# Altium PCB PCB_TEAM07_SMT_PCB.PcbDoc
Units mil, origin at the board's own origin, x right, y up, seen from the top; angles counter-clockwise.
Board outline 4932.76 x 3238.5 mil, 2 copper layers (Top Layer, Bottom Layer); 102 components, 54 nets, 304 pads, 154 vias.
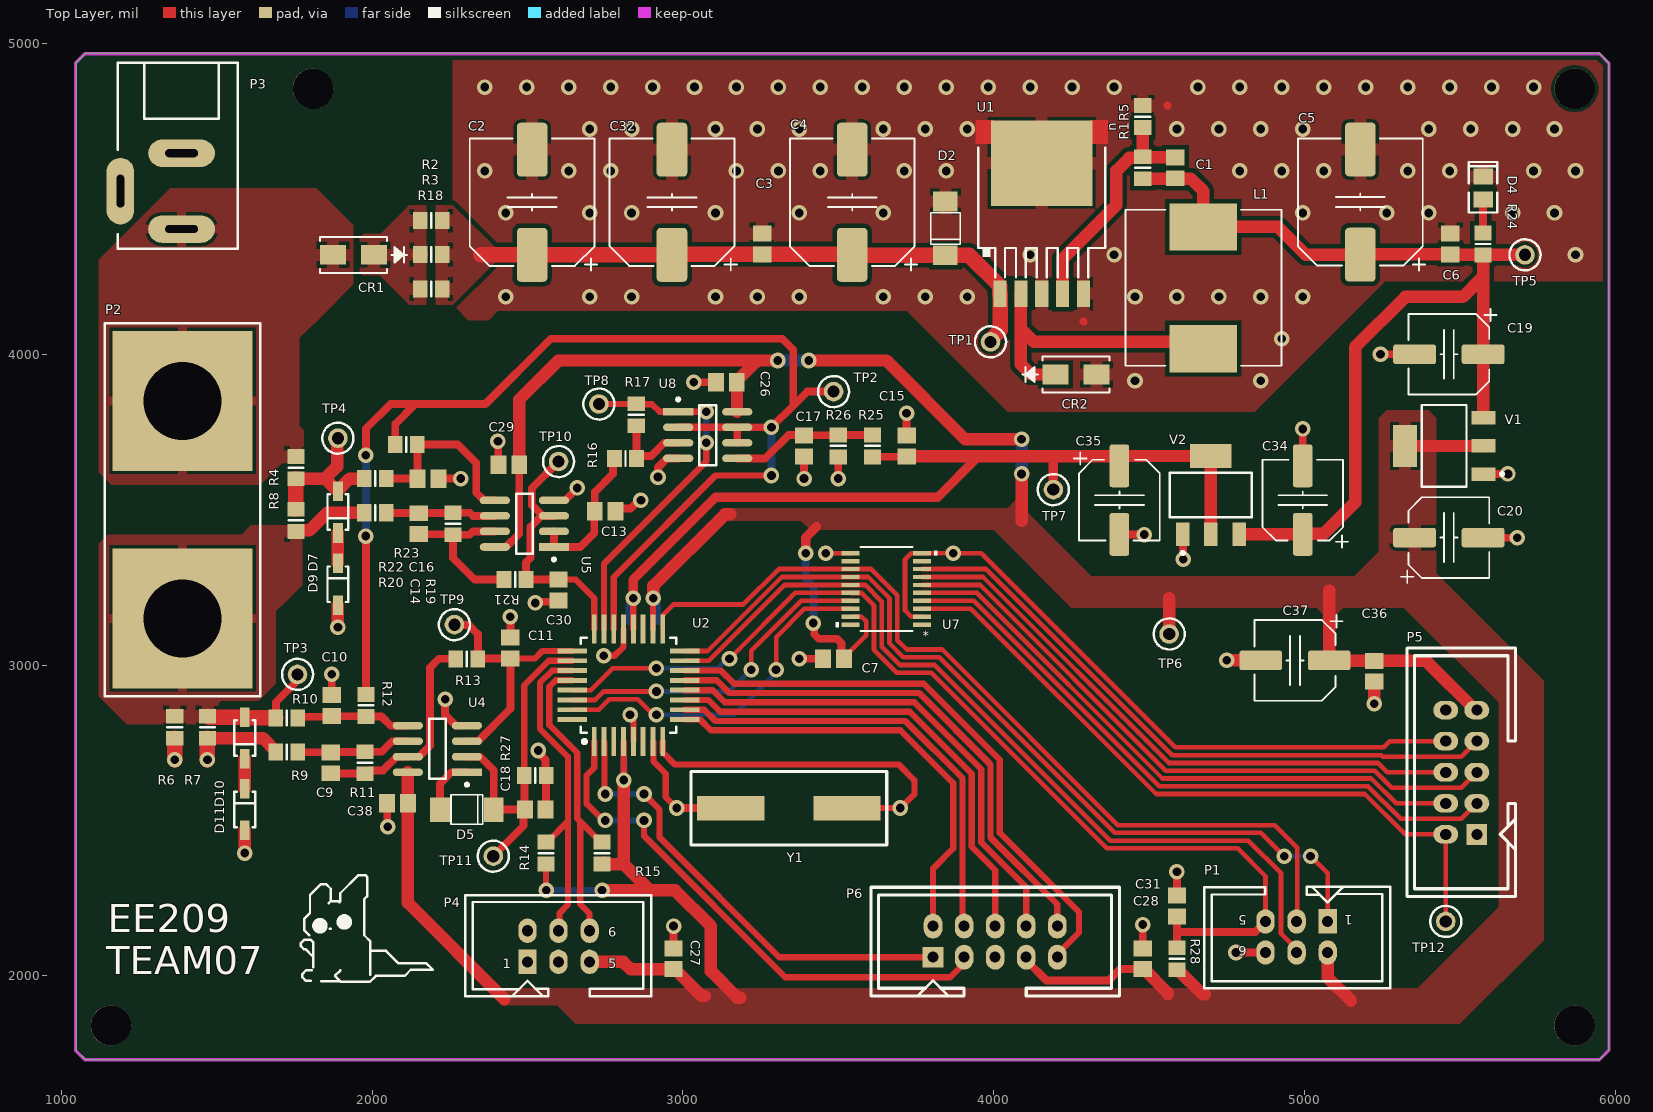
[diagram p0: Top Layer view]
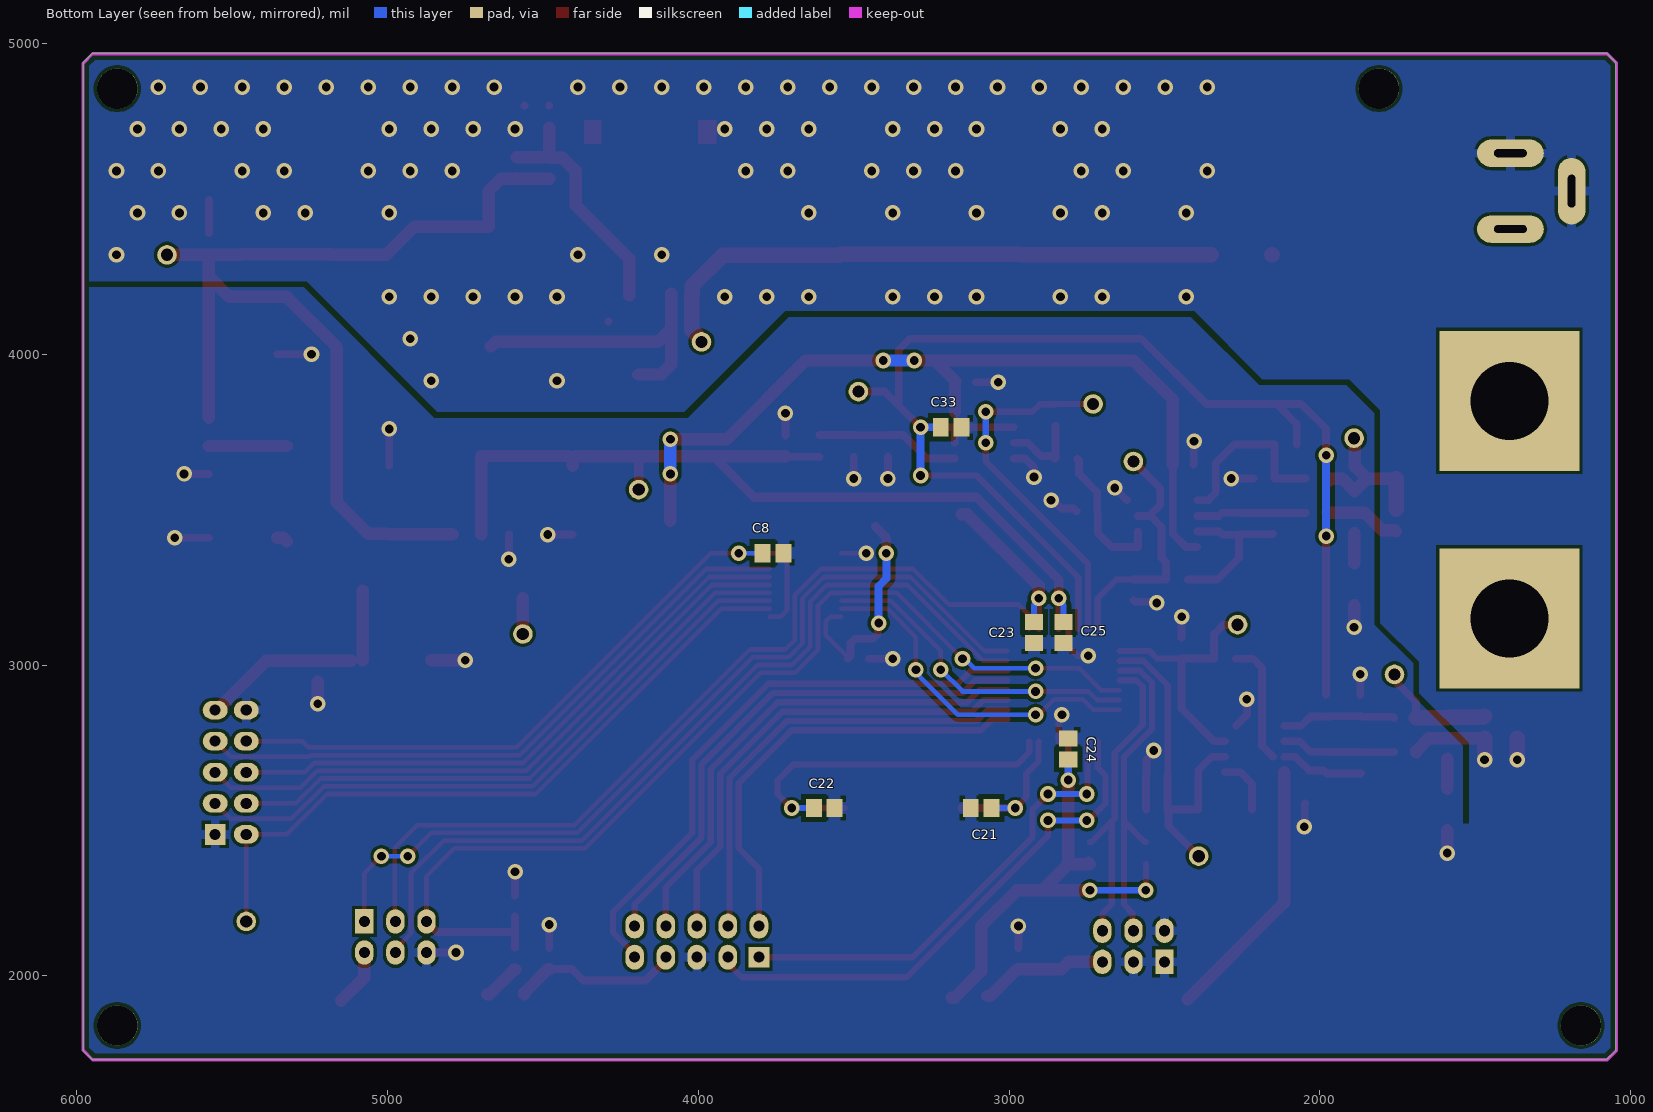
[diagram p1: Bottom Layer view, seen from below]
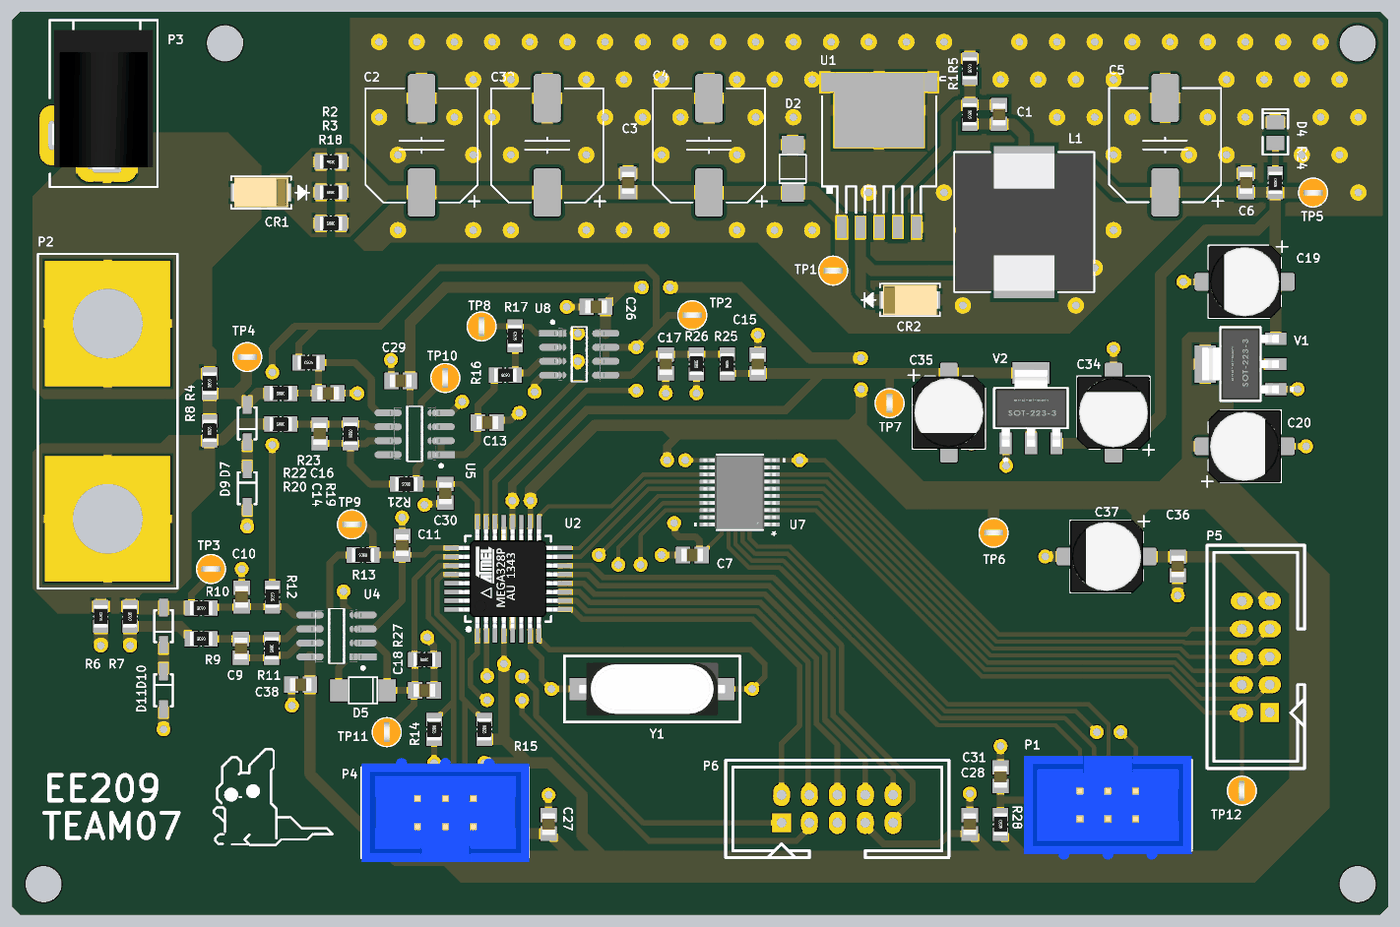
[diagram p2: 3D render of the assembled board from above, using the file's embedded part models]
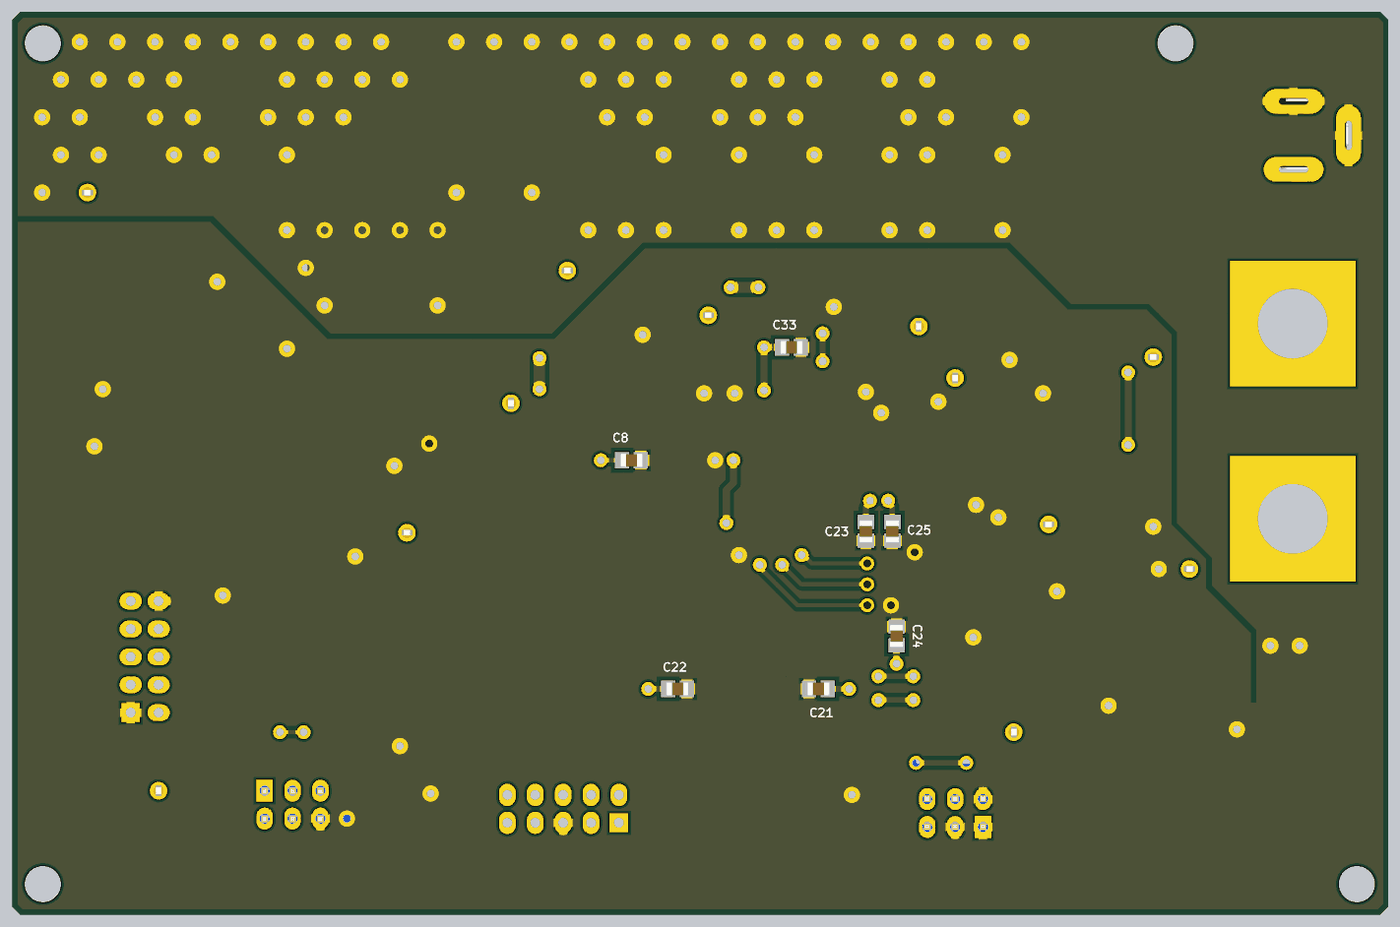
[diagram p3: 3D render of the assembled board from below, using the file's embedded part models]

## Layer stack, top to bottom
Top Solder: solder mask 0.4, Solder Resist, Dk 3.5
Top Layer: signal copper 1.4
Dielectric 1: dielectric 12.6, FR-4, Dk 4.8
Bottom Layer: signal copper 1.4
Bottom Solder: solder mask 0.4, Solder Resist, Dk 3.5

## Board outline
1047.24,1760 1047.24,4938.5 1077.24,4968.5 5950,4968.5 5980,4938.5 5980,1760 5950,1730 1077.24,1730

## Design rules (kind name [scope] priority, off if disabled: settings)
BoardOutlineClearance [All] p1: gap=11.81 ignorepadtopadclearanceinfootprint=FALSE except(15.75: Arc-SplitBarrior Arc-SplitContinuation Track-SplitBarrior Track-SplitContinuation SMDPad-SplitBarrior SMDPad-SplitContinuation THPad-SplitBarrior THPad-SplitContinuation Via-SplitBarrior Via-SplitContinuation Fill-SplitBarrior Fill-SplitContinuation Poly-SplitBarrior Poly-SplitContinuation Region-SplitBarrior Region-SplitContinuation Text-SplitBarrior Text-SplitContinuation)
Clearance [All] p1: gap=10 ignorepadtopadclearanceinfootprint=TRUE except(15: Arc-Fill Arc-Poly Arc-Region Track-Fill Track-Poly Track-Region SMDPad-Fill SMDPad-Poly SMDPad-Region Fill-Fill Fill-Poly Fill-Region Poly-Poly Poly-Region Region-Region)
Height [All] p1: minheight=0 maxheight=1968.5 prefheight=500
HoleSize [All] p1: absolutevalues=TRUE maxlimit=472.44 minlimit=9.84 maxpercent=80.000 minpercent=20.000
MinimumAnnularRing [All] p1: minimumring=5.12
MinimumSolderMaskSliver [All] p1: minsoldermaskwidth=4
PolygonConnect [All] p1: thpad.connectstyle=Relief thpad.reliefconductorwidth=30 thpad.reliefentries=4 thpad.polygonreliefangle="90 Angle" thpad.airgapwidth=10 smdpad.connectstyle=Relief smdpad.reliefconductorwidth=40 smdpad.reliefentries=4 smdpad.polygonreliefangle="90 Angle" smdpad.airgapwidth=10 via.connectstyle=Direct via.reliefconductorwidth=20 via.reliefentries=4 via.polygonreliefangle="90 Angle" via.airgapwidth=10
RoutingVias [All] p1: holewidth=15.75 width=25.59 viastyle="Through Hole" minholewidth=9.84 minwidth=15.75 maxholewidth=39.37 maxwidth=78.74
SilkToSilkClearance [All] p1: silktosilkclearance=4
SilkToSolderMaskClearance [IsPad] p1: minsilkscreentomaskgap=4 clearancetoexposedcopper=TRUE
SolderMaskExpansion [All] p1: expansion=4 istentingtop=FALSE
SupplyNets "Schematic Supply Nets_36" [InNet('7segOE')] p1: voltage=0.000
SupplyNets "Schematic Supply Nets_37" [InNet('ESP_RST_GPION')] p2: voltage=0.000
SupplyNets "Schematic Supply Nets_35" [InNet('Vvm')] p3: voltage=0.000
SupplyNets "Schematic Supply Nets_34" [InNet('Vac')] p4: voltage=0.000
SupplyNets "Schematic Supply Nets_33" [InNet('Vipk')] p5: voltage=0.000
SupplyNets "Schematic Supply Nets_32" [InNet('2.1Vdc')] p6: voltage=0.000
SupplyNets "Schematic Supply Nets_31" [InNet('3.3Vdc')] p7: voltage=0.000
SupplyNets "Schematic Supply Nets_30" [InNet('RX')] p8: voltage=0.000
SupplyNets "Schematic Supply Nets_29" [InNet('ESP_CLK_GPIO18')] p9: voltage=0.000
SupplyNets "Schematic Supply Nets_28" [InNet('TX')] p10: voltage=0.000
SupplyNets "Schematic Supply Nets_27" [InNet('ESP_MISO_GPIO19')] p11: voltage=0.000
SupplyNets "Schematic Supply Nets_26" [InNet('DS2')] p12: voltage=0.000
SupplyNets "Schematic Supply Nets_25" [InNet('TWISDA')] p13: voltage=0.000
SupplyNets "Schematic Supply Nets_24" [InNet('ESP_UART_RX')] p14: voltage=0.000
SupplyNets "Schematic Supply Nets_23" [InNet('DS4')] p15: voltage=0.000
SupplyNets "Schematic Supply Nets_22" [InNet('Vvs')] p16: voltage=0.000
SupplyNets "Schematic Supply Nets_21" [InNet('SH_ST')] p17: voltage=0.000
SupplyNets "Schematic Supply Nets_20" [InNet('ESP_MOSI_GPIO23')] p18: voltage=0.000
SupplyNets "Schematic Supply Nets_19" [InNet('MOSI')] p19: voltage=0.000
SupplyNets "Schematic Supply Nets_18" [InNet('DS3')] p20: voltage=0.000
SupplyNets "Schematic Supply Nets_17" [InNet('SCK')] p21: voltage=0.000
SupplyNets "Schematic Supply Nets_16" [InNet('Vis')] p22: voltage=0.000
SupplyNets "Schematic Supply Nets_15" [InNet('SH_CP')] p23: voltage=0.000
SupplyNets "Schematic Supply Nets_14" [InNet('TWISCL')] p24: voltage=0.000
SupplyNets "Schematic Supply Nets_13" [InNet('VvmCZ')] p25: voltage=0.000
SupplyNets "Schematic Supply Nets_12" [InNet('X2')] p26: voltage=0.000
SupplyNets "Schematic Supply Nets_11" [InNet('VdcRaw')] p27: voltage=0.000
SupplyNets "Schematic Supply Nets_10" [InNet('RST')] p28: voltage=0.000
SupplyNets "Schematic Supply Nets_9" [InNet('GND')] p29: voltage=0.000
SupplyNets "Schematic Supply Nets_8" [InNet('MISO')] p30: voltage=0.000
SupplyNets "Schematic Supply Nets_7" [InNet('SH_DS')] p31: voltage=0.000
SupplyNets "Schematic Supply Nets_6" [InNet('5Vdc')] p32: voltage=0.000
SupplyNets "Schematic Supply Nets_5" [InNet('7Vdc')] p33: voltage=0.000
SupplyNets "Schematic Supply Nets_4" [InNet('3.3VdcESP')] p34: voltage=0.000
SupplyNets "Schematic Supply Nets_3" [InNet('ESP_UART_TX')] p35: voltage=0.000
SupplyNets "Schematic Supply Nets_2" [InNet('X1')] p36: voltage=0.000
SupplyNets "Schematic Supply Nets_1" [InNet('DS1')] p37: voltage=0.000
SupplyNets "Schematic Supply Nets" [InNet('Vim')] p38: voltage=0.000
Width [All] p1: maxlimit=400 minlimit=5 preferedwidth=20
25 further rules are at their usual default settings.

## Components (designator, comment, footprint, x,y, rotation, side; value= is the part's Value field where it differs from the comment)
C1 "CAP000520" ECE-CAPC2012-0805SM 4585,4600 r90 top value=22nF
C2 "CAP000307" ECE-CAPAE10X10.2SM 2515,4489.29 r90 top value=220uF
C3 "CAP000524" ECE-CAPC2012-0805SM 3255,4355 r90 top value=100nF
C4 "CAP000307" ECE-CAPAE10X10.2SM 3545,4489.29 r90 top value=220uF
C5 "CAP000307" ECE-CAPAE10X10.2SM 5180,4490 r90 top value=220uF
C6 "CAP000524" ECE-CAPC2012-0805SM 5470,4355 r90 top value=100nF
C7 "CAP000524" ECE-CAPC2012-0805SM 3485,3020 r180 top value=100nF
C8 "CAP000524" ECE-CAPC2012-0805SM 3760,3360 r180 bottom value=100nF
C9 "CAP000524" ECE-CAPC2012-0805SM 1867.33,2685.39 r90 top value=100nF
C10 "CAP000524" ECE-CAPC2012-0805SM 1870,2870 r90 top value=100nF
C11 "CAP000524" ECE-CAPC2012-0805SM 2445,3055 r90 top value=100nF
C13 "CAP000524" ECE-CAPC2012-0805SM 2750,3495 r0 top value=100nF
C14 "CAP000524" ECE-CAPC2012-0805SM 2150,3455 r90 top value=100nF
C15 "CAP000524" ECE-CAPC2012-0805SM 3720,3705 r90 top value=100nF
C16 "CAP000524" ECE-CAPC2012-0805SM 2180,3600 r0 top value=100nF
C17 "CAP000524" ECE-CAPC2012-0805SM 3390,3705 r270 top value=100nF
C18 "CAP000524" ECE-CAPC2012-0805SM 2525,2535 r0 top value=100nF
C19 "CAP000305" ECE-CAPAE6.3X5.4SM 5465,4000 r180 top value=47uF
C20 "CAP000305" ECE-CAPAE6.3X5.4SM 5465,3410 r0 top value=47uF
C21 "CAP000524" ECE-CAPC2012-0805SM 3090,2540 r0 bottom value=100nF
C22 "CAP000524" ECE-CAPC2012-0805SM 3595,2540 r180 bottom value=100nF
C23 "CAP000524" ECE-CAPC2012-0805SM 2920,3105 r270 bottom value=100nF
C24 "CAP000524" ECE-CAPC2012-0805SM 2810,2730 r90 bottom value=100nF
C25 "CAP000524" ECE-CAPC2012-0805SM 2825,3105 r270 bottom value=100nF
C26 "CAP000524" ECE-CAPC2012-0805SM 3140,3910 r180 top value=100nF
C27 "CAP000524" ECE-CAPC2012-0805SM 2970,2055 r90 top value=100nF
C28 "CAP000524" ECE-CAPC2012-0805SM 4480,2055 r90 top value=100nF
C29 "CAP000524" ECE-CAPC2012-0805SM 2440,3645 r180 top value=100nF
C30 "CAP000524" ECE-CAPC2012-0805SM 2600,3241.54 r270 top value=100nF
C31 "CAP000524" ECE-CAPC2012-0805SM 4590,2224.57 r90 top value=100nF
C32 "CAP000307" ECE-CAPAE10X10.2SM 2965,4489.29 r90 top value=220uF
C33 "CAP000524" ECE-CAPC2012-0805SM 3186.54,3765 r180 bottom value=100nF
C34 "CAP000305" ECE-CAPAE6.3X5.4SM 4994.8,3530.82 r90 top value=47uF
C35 "CAP000305" ECE-CAPAE6.3X5.4SM 4404.8,3530.82 r270 top value=47uF
C36 "CAP000524" ECE-CAPC2012-0805SM 5225,2980 r270 top value=100nF
C37 "CAP000305" ECE-CAPAE6.3X5.4SM 4970,3015 r180 top value=47uF
C38 "CAP000524" ECE-CAPC2012-0805SM 2081.54,2555 r180 top value=100nF
CR1 "SS34" DO-214ACSMA2_MDD 1940,4320 r180 top
CR2 "SS34" DO-214ACSMA2_MDD 4265,3935 r0 top
D2 "DIO000102" ECE-DO214ACSM 3845,4405 r270 top value=CGRA4007-G
D4 "DIO000105" ECE-LED2012-0805SM 5575,4535 r90 top value=LTST-C170KAKT
D5 "DIO000102" ECE-DO214ACSM 2305,2535 r0 top value=CGRA4007-G
D7 "ZEN000018" ECE-DIO-SOD123SM 1890,3491.93 r270 top value=BZT52H-B4V7,115
D9 "ZEN000018" ECE-DIO-SOD123SM 1890,3260 r90 top value=BZT52H-B4V7,115
D10 "ZEN000018" ECE-DIO-SOD123SM 1590,2765 r270 top value=BZT52H-B4V7,115
D11 "ZEN000018" ECE-DIO-SOD123SM 1590,2535 r90 top value=BZT52H-B4V7,115
L1 "DR127-331-R" DR127 4675,4214 r90 top
P1 "CON000007" ECE-BHDR2X3TH 5075,2175 r180 top value="3 X 2 IDC"
P2 "AC_Output" "Dual Banana Connector-Footprint-1" 1390,3500 r90 top
P3 "AC_Input" "Barrel Jack-Footprint-1" 1386.85,4639.17 r270 top
P4 "CON000007" ECE-BHDR2X3TH 2500,2045 r0 top value="3 X 2 IDC"
P5 "CON000008" ECE-BHDR-2X5TH 5555,2455 r90 top value="5 X 2 IDC"
P6 "CON000008" ECE-BHDR-2X5TH 3805,2060 r0 top value="5 X 2 IDC"
R1 "RES000501" ECE-RESC2012-0805SM 4480,4600 r270 top value=0
R2 "RES000501" ECE-RESC2012-0805SM 2190,4430 r180 top value=0
R3 "RES000501" ECE-RESC2012-0805SM 2190,4320.94 r180 top value=0
R4 "RES000501" ECE-RESC2012-0805SM 1755,3635.43 r90 top value=0
R5 "RES000501" ECE-RESC2012-0805SM 4480,4765 r270 top value=0
R6 "RES000501" ECE-RESC2012-0805SM 1365,2800 r270 top value=0
R7 "RES000501" ECE-RESC2012-0805SM 1470,2800 r90 top value=0
R8 "RES000501" ECE-RESC2012-0805SM 1755,3465.43 r90 top value=0
R9 "RES000501" ECE-RESC2012-0805SM 1725,2720 r180 top value=0
R10 "RES000501" ECE-RESC2012-0805SM 1725,2830 r180 top value=0
R11 "RES000501" ECE-RESC2012-0805SM 1977.33,2685.39 r270 top value=0
R12 "RES000501" ECE-RESC2012-0805SM 1980,2870 r270 top value=0
R13 "RES000501" ECE-RESC2012-0805SM 2305,3020 r180 top value=0
R14 "RES000501" ECE-RESC2012-0805SM 2560,2395 r270 top value=0
R15 "RES000501" ECE-RESC2012-0805SM 2740,2395 r270 top value=0
R16 "RES000501" ECE-RESC2012-0805SM 2815.43,3665 r180 top value=0
R17 "RES000501" ECE-RESC2012-0805SM 2850,3805.43 r270 top value=0
R18 "RES000501" ECE-RESC2012-0805SM 2190,4210 r180 top value=0
R19 "RES000501" ECE-RESC2012-0805SM 2260,3455 r270 top value=0
R20 "RES000501" ECE-RESC2012-0805SM 2010,3490 r180 top value=0
R21 "RES000501" ECE-RESC2012-0805SM 2460,3275 r180 top value=0
R22 "RES000501" ECE-RESC2012-0805SM 2010,3600 r180 top value=0
R23 "RES000501" ECE-RESC2012-0805SM 2110,3710 r0 top value=0
R24 "RES000501" ECE-RESC2012-0805SM 5575,4355 r270 top value=0
R25 "RES000501" ECE-RESC2012-0805SM 3610,3705 r90 top value=0
R26 "RES000501" ECE-RESC2012-0805SM 3500,3705 r90 top value=0
R27 "RES000501" ECE-RESC2012-0805SM 2525,2645 r180 top value=0
R28 "RES000501" ECE-RESC2012-0805SM 4590,2054.57 r270 top value=0
TP1 "Test_Point_TH" Test-Pin-TH 3990,4040 r0 top
TP2 "Test_Point_TH" Test-Pin-TH 3485,3880 r0 top
TP3 "Test_Point_TH" Test-Pin-TH 1760,2970 r0 top
TP4 "Test_Point_TH" Test-Pin-TH 1890,3730 r0 top
TP5 "Test_Point_TH" Test-Pin-TH 5710,4320 r0 top
TP6 "Test_Point_TH" Test-Pin-TH 4565,3100 r0 top
TP7 "Test_Point_TH" Test-Pin-TH 4192.2,3564.59 r270 top
TP8 "Test_Point_TH" Test-Pin-TH 2730,3840 r270 top
TP9 "Test_Point_TH" Test-Pin-TH 2265,3130 r0 top
TP10 "Test_Point_TH" Test-Pin-TH 2600,3655 r90 top
TP11 "Test_Point_TH" Test-Pin-TH 2390,2385 r90 top
TP12 "Test_Point_TH" Test-Pin-TH 5455,2175 r90 top
U1 "LM2596S-ADJ/NOPB" KTT0005B 4154.8,4405.14 r270 top
U2 "ATMEGA328PB-AU" TQFP-32 2825,2935 r90 top
U4 "TLC082CDR" SOIC8-Ti-Footprint 2210.02,2730 r180 top
U5 "TLC082CDR" SOIC8-Ti-Footprint 2490,3455 r180 top
U7 "TXS0108EPWR" PW20 3655,3245 r180 top
U8 "TLC082CDR" SOIC8-Ti-Footprint 3080.02,3740 r0 top
V1 "REG000102" ECE-SOT223SM 5450,3705 r180 top value=LD1117S33CTR
V2 "REG000101" ECE-SOT223SM 4699.25,3546.8 r90 top value=LD1117S33CTR
Y1 "ABLS-16.000MHZ-B4-T" HC49-U-Crystal 3341.32,2539.54 r0 top

## Footprints (in the part's own frame and the unit in brackets; to place one, negate y for a bottom-side part, rotate by r counter-clockwise, add the part's x,y. Pads: shape width x height; smd on the part's side, far side on the other; paste and mask are expansions set on the pad)
"Barrel Jack-Footprint-1" [mm]
  oval 2.25x5.45 hole 0.635 slot 2.667 at 90 deg: 1(6,0) 3(-0.2,0)
  oval 5.45x2.25 hole 0.635 slot 2.667 at 0 deg: 2(2.9,-5)
  silkscreen extent -7.6,-5.2 7.6,4.6, body extent -6.7,-5 6,4.2, height 10.5
DO-214ACSMA2_MDD [mil]
  rect 84.59x63 smd paste+0 mask+0: 1(-66.11,0) 2(66.11,0)
  silkscreen extent -172,-58 108,58, body extent -103,-53 103,53, height 89
DR127 [mil]
  rect 152x217 smd paste+0 mask+0: 1(-196,0) 2(196,0)
  silkscreen extent -251,-251 251,251, body extent -246,-246 246,246, height 315
"Dual Banana Connector-Footprint-1" [mil]
  rect 450x450 hole 250: 1(-350,0) 2(350,0)
  silkscreen extent -600,-250 600,250, body extent -584,-236 586,236, height 217
ECE-BHDR2X3TH [mm] "IDC 3X2 Way 2.54 pitch"
  rect 1.5x2 hole 0.9: 1(0,0)
  oval 1.5x2 hole 0.9 paste-2539.97: 2(0,2.54)
  oval 1.5x2 hole 0.9: 3(2.54,0) 4(2.54,2.54) 5(5.08,0) 6(5.08,2.54)
  silkscreen extent -5.1,-2.82 10.1,5.45, body extent -5.07,-3.17 10.17,6.28, height 9.1
ECE-BHDR-2X5TH [mil] "IDC 10 pin 2.54 pitch"
  rect 66.93x66.93 hole 35.43: 1(0,0)
  oval 60x80 hole 35.43: 2(0,100) 3(100,0) 4(100,100) 5(200,0) 6(200,100) 7(300,0) 8(300,100) 9(400,0) 10(400,100)
  silkscreen extent -200,-125 600,225
ECE-CAPAE6.3X5.4SM [mm] "Capacitor, polarized, aluminum can; 6.3x5.4mm DxH"
  round 0.508 on Mech15: 0(0,0)
  rrect25% 3.5x1.6 smd: 1(-2.8,0) 2(2.8,0)
  silkscreen extent -3.9,-3.7 3.3,3.3, body extent -3.3,-3.3 3.3,3.3, height 4.23
ECE-CAPAE10X10.2SM [mm] "Capacitor, polarized, aluminum can; 10x10.2mm DxH"
  round 0.508 on Mech15: 0(0,0)
  rrect25% 4.4x2.5 smd: 1(-4.3,0) 2(4.3,0)
  silkscreen extent -5.6,-5.3 5.2,5.1
ECE-CAPC2012-0805SM [mm] "Chip Capacitor, Body 2.0x1.3mm, IPC Medium Density"
  rect 1.3x1.5 smd: 1(-0.85,0) 2(0.85,0)
  body extent -1,-0.6 1,0.6, height 1.2
ECE-DIO-SOD123SM [mm] "SOD-123; 2 Leads; Body 2.7 x 1.6 mm, (LxW)"
  rect 1.6x0.8 smd: 1(-1.7,0) 2(1.7,0)
  silkscreen extent -1.45,-0.85 1.45,0.85
ECE-DO214ACSM [mm] "JEDEC DO214AC body 2.7X5.3X2.6"
  rect 1.6x2 smd: 1(-2.2,0) 2(2.2,0)
  silkscreen extent -1.3,-1.2 1.3,1.2
ECE-LED2012-0805SM [mm] "RED AS AlGaAs SMD LED, Body; 2mm x 1.25 mm (LxW)"
  rect 1.3x1.6 smd: 1(-0.95,0) 2(0.95,0)
  silkscreen extent -2,-1.15 2.13,1.15
ECE-RESC2012-0805SM [mm] "Chip Resistor, Body 2.0x1.3mm, IPC Medium Density"
  rect 1.2x1.4 smd: 1(-0.9,0) 2(0.9,0)
  silkscreen extent 0,-0.6 0,0.6, body extent -1,-0.62 1,0.63, height 0.5
ECE-SOT223SM [mm] "Transistor SOT223 Body 6.7X3.7X1.8"
  rect 1.95x1.1 smd: 1(-3.2,2.3) 2(-3.2,0) 3(-3.2,-2.3)
  rect 1.95x3.4 smd: 4(3.2,0)
  silkscreen extent -4.85,-3.35 1.83,3.35, body extent -3.5,-3.25 3.5,3.25, height 1.7
HC49-U-Crystal [mm]
  rect 5.5x2 smd: 1(-4.75,0) 2(4.75,0)
  silkscreen extent -8,-3 8,3, body extent -6.65,-2.4 6.65,2.4, height 4.6
KTT0005B [mm]
  rect 2.16x1.07 smd paste-0.102 mask+0.051: 1(5.338,-3.4) 2(5.338,-1.7) 3(5.338,0.005) 4(5.338,1.7) 5(5.338,3.4)
  rect 6.99x8.33 smd paste-0.102 mask+0.051: 6(-5.338,0)
  Top Layer region: -8.832,5.4 -8.832,4 -6.923,4 -6.923,5.4
  Top Layer region: -8.832,-3.9 -8.832,-5.4 -6.923,-5.4 -6.923,-3.9
  silkscreen extent -6.6,-5.2 4,5.2
PW20 [mil]
  rect 57.56x13.97 smd paste+0 mask+0: 1(-115,115.16) 2(-115,89.57) 3(-115,63.98) 4(-115,38.39) 5(-115,12.8) 6(-115,-12.8) 7(-115,-38.39) 8(-115,-63.98) 9(-115,-89.57) 10(-115,-115.16) 11(115,-115.16) 12(115,-89.57) 13(115,-63.98) 14(115,-38.39) 15(115,-12.8) 16(115,12.8) 17(115,38.39) 18(115,63.98) 19(115,89.57) 20(115,115.16)
  silkscreen extent -164,-135 164,135, body extent -130,-130 130,130, height 47
SOIC8-Ti-Footprint [mil]
  rect 97.21x24.49 smd paste+0 mask+0: 1(-95.02,75)
  rrect100% 97.21x24.49 smd paste+0 mask+0: 2(-95.02,25) 3(-95.02,-25) 4(-95.02,-75) 5(95.02,-75) 6(95.02,-25) 7(95.02,25) 8(95.02,75)
  silkscreen extent -100,-97 27,120, body extent -163,-116 163,116, height 10
Test-Pin-TH [mm]
  round 1.6 hole 1: 1(0,0)
  silkscreen extent -1.27,-1.27 1.27,1.27, body extent -1.27,-1.27 1.27,1.27, height 4.57
TQFP-32 [mm] "TQFP, 32-Leads, Body 7x7mm, Pitch 0.8mm"
  rect 2.4x0.4 smd: 1(-4.6,2.8) 2(-4.6,2) 3(-4.6,1.2) 4(-4.6,0.4) 5(-4.6,-0.4) 6(-4.6,-1.2) 7(-4.6,-2) 8(-4.6,-2.8) 17(4.6,-2.8) 18(4.6,-2) 19(4.6,-1.2) 20(4.6,-0.4) 21(4.6,0.4) 22(4.6,1.2) 23(4.6,2) 24(4.6,2.8)
  rect 0.4x2.4 smd: 9(-2.8,-4.6) 10(-2,-4.6) 11(-1.2,-4.6) 12(-0.4,-4.6) 13(0.4,-4.6) 14(1.2,-4.6) 15(2,-4.6) 16(2.8,-4.6) 25(2.8,4.6) 26(2,4.6) 27(1.2,4.6) 28(0.4,4.6) 29(-0.4,4.6) 30(-1.2,4.6) 31(-2,4.6) 32(-2.8,4.6)
  silkscreen extent -4.74,-3.9 3.9,3.9, body extent -4.5,-4.5 4.5,4.5, height 1

## Part data
C1: library part CMP-039-000133-1, "CAP CER 22nF 50V X7R SM0805", Manufactuer=Samsung, Manufacturer-PN=CL21B223KBANNNC, Size/Package="0805 (2012 Metric)", Voltage/Current=50V, Assembly Method="Surface Mount", Category=Capacitor, Component Type=CAP-0805-22nF, Item Type=Item, Path="ece/ts/Lists/Stock Inventory", Status=Active, Supplier1=Digikey, Supplier1-PN=1276-1081-2-ND, UoA Stock#=CAP000520
C2 C4 C5 C32: library part CMP-039-000113-1, "CAP 220uF 25V ELE SM", Manufactuer=Nichicon, Manufacturer-PN=UWX1C101MCL1GB, Size/Package="10 X 10.2", Voltage/Current=25V, Assembly Method="Surface Mount", Category=Capacitor, Component Type=CAP-10X10.2-220uF-25V, Datasheet Link=http://share.engineering.auckland.ac.nz/ece/ts/Student%20Documents/SMT-Ecaps-e-wx.pdf, Item Type=Item, Path="ece/ts/Lists/Stock Inventory", Status=Active, Supplier1=Digikey, Supplier1-PN=493-2105-2-ND, UoA Stock#=CAP000307
C3 C6 C7 C8 C9 C10 C11 C13 C14 C15 C16 C17 C18 C21 C22 C23 C24 C25 C26 C27 C28 C29 C30 C31 C33 C36 C38: library part CMP-039-000137-1, "CAP CER 100nF 50V X7R SM0805", Manufactuer=Samsung, Manufacturer-PN=CL21B104KBCNNNC, Size/Package="0805 (2012 Metric)", Voltage/Current=50V, Assembly Method="Surface Mount", Category=Capacitor, Component Type=CAP-0805-100nF, Item Type=Item, Path="ece/ts/Lists/Stock Inventory", Status=Active, Supplier1=Digikey, Supplier1-PN=276-1003-2-ND, UoA Stock#=CAP000524
C19 C20 C34 C35 C37: library part CMP-039-000111-1, "CAP 47uF 16V ELE SM", Manufactuer=Nichicon, Manufacturer-PN=UWT1C470MCL1GB, Size/Package="6.3 X 5.4", Voltage/Current=16V, Assembly Method="Surface Mount", Category=Capacitor, Component Type=CAP-6.3X5.4-47uF-16V, Datasheet Link=http://share.engineering.auckland.ac.nz/ece/ts/Student%20Documents/SMT-Ecaps-e-wt.pdf, Item Type=Item, Path="ece/ts/Lists/Stock Inventory", Status=Active, Supplier1=Digikey, Supplier1-PN=493-2176-2-ND, UoA Stock#=CAP000305
CR1 CR2: "Description", Manufacturer_Name="Microdiode Electronics", Copyright="Copyright (C) 2026 Ultra Librarian. All rights reserved.", Manufacturer_Part_Number=SS34
D2 D5: library part CMP-043-000008-1, "Diode Rectifier 1N4007 SM", Manufactuer="Comchip Technology", Manufacturer-PN=CGRA4007-G, Size/Package=DO-214, Voltage/Current="1A 1KV", Assembly Method="Surface Mount", Category=Diode, Component Type=DO214-4007, Datasheet Link=http://share.engineering.auckland.ac.nz/ece/ts/Student%20Documents/Diode-CGRA4001-G.pdf, Item Type=Item, Path="ece/ts/Lists/Stock Inventory", Status=Active, Supplier1=Digikey, Supplier1-PN=641-1018-2-ND, UoA Stock#=DIO000102
D4: library part CMP-043-000011-1, "LED RED ORANGE CLEAR 0805 SMD", Manufactuer="Lite-On Inc", Manufacturer-PN=LTST-C170KAKT, Size/Package="0805 (2012 Metric)", Voltage/Current=20mA, Assembly Method="Surface Mount", Category=Diode, Component Type=LED-0805-RED, Datasheet Link=http://share.engineering.auckland.ac.nz/ece/ts/Student%20Documents/LED-S_110_LTST-C170KAKT.pdf, Item Type=Item, Path="ece/ts/Lists/Stock Inventory", Status=Active, Supplier1=Digikey, Supplier1-PN=160-1412-6-ND, UoA Stock#=DIO000105
D7 D9 D10 D11: library part CMP-055-000017-1, "4.7V Zener Diodes SM", Manufactuer="NXP Semiconductors", Manufacturer-PN=BZT52H-B4V7,115, Size/Package=SOD-123, Voltage/Current=4.7V, Assembly Method="Surface Mount", Category=Zener, Item Type=Item, Path="ece/ts/Lists/Stock Inventory", Status=Active, Supplier1=Digikey, Supplier1-PN=568-11146-1-ND, UoA Stock#=ZEN000018
L1: "Description", Manufacturer_Name=Eaton, Copyright="Copyright (C) 2026 Ultra Librarian. All rights reserved.", Manufacturer_Part_Number=DR127-331-R
P1 P4: library part CMP-042-000000-1, "IDC PLUG 6 WAY TH", Manufactuer=FCI, Manufacturer-PN=71600-006LF, Size/Package="2.54 Radial", Assembly Method="Through hole", Category=Connector, Component Type=NA, Datasheet Link=http://share.engineering.auckland.ac.nz/ece/ts/Student%20Documents/IDC-6way.pdf, Item Type=Item, Path="ece/ts/Lists/Stock Inventory", Status=Active, Supplier1=Digikey, Supplier1-PN=609-2841-ND, UoA Stock#=CON000007
P2: library part CMP-002-00001-1, "Dual Banan connector"
P3: library part CMP-002-00000-1, "Barrel jack"
P5 P6: library part CMP-042-000001-1, "IDC PLUG 10 WAY TH", Manufactuer=Mantech, Manufacturer-PN=YRNW10, Size/Package="2.54 pitch", Assembly Method="Through hole", Category=Connector, Component Type=NA, Datasheet Link=http://share.engineering.auckland.ac.nz/ece/ts/Student%20Documents/IDC-box%20headers.pdf, Item Type=Item, Path="ece/ts/Lists/Stock Inventory", Status=Active, Supplier1=Elecon, Supplier1-PN=YRNW10, UoA Stock#=CON000008
R1 R2 R3 R4 R5 R6 R7 R8 R9 R10 R11 R12 R13 R14 R15 R16 R17 R18 R19 R20 R21 R22 R23 R24 R25 R26 R27 R28: library part CMP-052-000171-1, "RES CER 0R 2012 SM", Size/Package=2012, Voltage/Current=1/8W, Assembly Method="Surface Mount", Category=Resistor, Component Type=RES-2012-0R, Item Type=Item, Path="ece/ts/Lists/Stock Inventory", Status=Active, UoA Stock#=RES000501
TP1 TP2 TP3 TP4 TP5 TP6 TP7 TP8 TP9 TP10 TP11 TP12: library part CMP-002-00002-1, "Test pin TH generic"
U1: library part LM2596S-ADJNOPB, "SIMPLE SWITCHER&reg; 4.5V to 40V, 3A Low Component Count Step-Down Regulator 5-DDPAK/TO-263 -40 to 125", Manufacturer="Texas Instruments", PartNumber=LM2596SX-ADJ/NOPB, Alternate_PartNumber=LM2596S-ADJ/NOPB, CompType=IC, Copyright="Copyright (C) 2025 Ultra Librarian. All rights reserved.", Manufacturer_Name="Texas Instruments", Manufacturer_Part_Number=LM2596S-ADJ/NOPB, MountType=SMT, PackageReference=KTT0005B, RefDes=RefDes, RoHS=Y, Type=TYPE
U2: library part CMP-00019-1, "AVR 32KB Flash, 1KB EEPROM, 2KB Ram, 20MHZ, TQFP", Case/Package=TQFP, Clock Frequency=20MHz, Operating Supply Voltage=5V, Number of I/Os=27, Pins=32, RAM Size=2kB
U4 U5 U8: library part CMP-001-0003-1, "Dual 3pA 19V/us 10MHz 1900uV SOIC-8 Operational Amplifier", Case/Package=SOIC, Input Bias Current=50pA, Input Offset Voltage (Vos)=1.9mV, Max Supply Voltage=16V, Output Current=57mA, Bandwidth=10MHz, Common Mode Rejection Ratio=80dB, Gain Bandwidth Product=10MHz, Number of Amplifiers=2, Slew Rate=16V/µs
U7: "Eight-bit bidirectional voltage-level shifter for open-drain and push-pull applications 20-TSSOP -40 to 85", Manufacturer_Name="Texas Instruments", Copyright="Copyright (C) 2025 Ultra Librarian. All rights reserved.", Manufacturer_Part_Number=TXS0108EPWR, RefDes=RefDes, Type=Type
V1: library part CMP-051-000003-1, "IC REG LDO 5V 0.8A SOT223SM", Manufactuer=STMicroelectronics, Manufacturer-PN=LD1117S50CTR, Size/Package=SOT223, Voltage/Current=5V/800mA, Assembly Method="Surface Mount", Category=Regulator, Component Type=REG-SOT223-LD5V, Datasheet Link=http://share.engineering.auckland.ac.nz/ece/ts/Student%20Documents/LD1117.pdf, Item Type=Item, Path="ece/ts/Lists/Stock Inventory", Status=Active, Supplier1=Digikey, Supplier1-PN=497-1243-6-ND, UoA Stock#=REG000102
V2: library part CMP-051-000002-1, "IC REG LDO 3.3V 0.8A SOT223SM", Manufactuer=STMicroelctronics, Manufacturer-PN=LD1117S33CTR, Size/Package=SOT223, Voltage/Current=3.3V/800mA, Assembly Method="Surface Mount", Category=Regulator, Component Type=REG-SOT223-LD3.3, Datasheet Link=http://share.engineering.auckland.ac.nz/ece/ts/Student%20Documents/LD1117.pdf, Item Type=Item, Path="ece/ts/Lists/Stock Inventory", Status=Active, Supplier1=Digikey, Supplier1-PN=497-1241-6-ND, UoA Stock#=REG000101
Y1: library part CMP-00025-1, "Crystal 16MHz ±30ppm (Tol) ±50ppm (Stability) 18pF FUND 40Ohm 2-Pin HC-49/US SMD T/R", Case/Package=HC-49/US, Frequency=16MHz, Frequency Stability=50ppm, Frequency Tolerance=0.003%

## Free pads (board coordinates)
  round 130 hole 130 unplated: 7(5870,4855) 8(1810,4855) 9(5870,1840) 10(1160,1840)

## Via types
v1: diameter 50, hole 28, Top Layer to Bottom Layer, 154 vias

## Nets (pads, with @x,y where several pads share a name; then routed paths per layer and width w, separated by ;. In a path a pad name is that pad's centre, name@x,y a point inside that pad or via, vN(x,y) a via of type N, cw(c..) or ccw(c..) an arc to the next point about the centre after c; other vN are vias at no path point)
2.1Vdc: C33.1 R12.1 R23.1 TP2.1 U2.22 U8.2 U8.6 U8.7 | length 4326.3
  Top Layer w20: U2.22 2777.76,3282.76 3105,3610 v1(3285,3610)
  Top Layer w25: R12.1 v1(1980,3415) ; v1(1980,3675) 1980,3760 2060,3840 2135,3840 ; R23.1 2074.57,3775.43 2135,3835.87 2135,3840 ; U8.2 U8.7 ; U8.6 U8.7 ; TP2.1 3400,3880 3355,3835 ; 2135,3840 2365,3840 2575,4050 3320,4050 3355,4015 3355,3835 ; U8.7 v1(3285,3765) 3355,3835
  Bottom Layer w25: v1(1980,3415) v1(1980,3675) ; C33.1 v1(3285,3765) v1(3285,3610)
3.3Vdc: C15.1 C25.1 C35.1 R25.1 TP7.1 U2.20 V2.2 V2.4 | length 2996
  Top Layer w20: v1(2840,3215) 2840.37,3214.63 2840.37,3116.48 U2.20
  Top Layer w25: R25.1 3610.98,3670.55 C15.1@3719.02,3670.55
  Top Layer w30: v1(2840,3215) 2840,3275 3105,3540 3820,3540 3951.54,3671.54 ; 4190,3671.54 4192.2,3669.34 TP7.1
  Top Layer w40: C15.1 3951.54,3671.54 4190,3671.54 4393.31,3671.54 C35.1@4404.8,3660.04 ; C35.1 4404.8,3661.29 4416.3,3672.79 V2.4 V2.2
  Bottom Layer w20: C25.1 2825,3191.88 2840,3206.88 v1(2840,3215)
3.3VdcESP: C8.1 P5.8 U7.2 U7.10 | length 2319.9
  Top Layer w15: U7.2 3735.08,3155.43 3715,3175.51 3715,3340 3723.72,3348.72 3723.72,3348.8 3735.08,3360.16 U7.10 v1(3869.84,3360.16) 3959.84,3360.16 4585,2735 5255,2735 5275,2755 P5.8
  Bottom Layer w15: C8.1 3793.62,3360.16 v1(3869.84,3360.16)
5Vdc: C7.1 C20.1 C23.1 C24.1 C26.1 C27.1 C28.1 C29.1 C36.1 C37.1 C38.1 P1.2 P4.5 P5.9 P6.7 R14.2 R15.2 R28.2 TP6.1 U2.4 U2.18 U4.8 U5.8 U7.19 U8.8 V1.2 V1.4 | length 8888.5
  Top Layer w15: C7.1@3518.46,3023.94 3590,3095.47 3590,3140.36 3574.92,3155.43 U7.19
  Top Layer w20: v1(2560,2275) R14.2 ; U2.4 2809.63,2753.52 2809.63,2630.37 v1(2810,2630) ; U2.18 2904.37,3116.73 2904.37,3214.37 v1(2905,3215)
  Top Layer w25: U5.8 2430.83,3380 2473.46,3422.64 C29.1 ; C26.1 C26.1@3174.26,3909.21 ; U8.8@3174.26,3815.25 3174.51,3815 U8.8 ; v1(3420,3135) 3423.03,3131.97 3423.03,3099.64 3437.68,3085 3496.02,3085 3510.67,3070.36 3510.67,3027.8 C7.1 ; P6.7 4105,2050 4170,1985 4370,1985 4406.54,2021.54 C28.1
  Top Layer w30: v1(3395,3360) 3395,3410 3430,3445
  Top Layer w40: U4.8 C38.1 2115,2235 2425,1925 ; C29.1 2473.46,3853.94 2599.53,3980 v1(3305,3980) ; P4.5 2808.07,2045 2831.54,2021.54 C27.1 2973.94,2021.54 3060.47,1935 3070,1935 ; v1(2740,2275) 2894.28,2275 ; R15.2@2743.62,2363.19 R15.2 2808.85,2359.57 2809.28,2360 ; v1@2809.28,2629.28 2809.28,2360 ; v1(2905,3215) 2905.1,3215.1 2905.1,3255.1 3135,3485 3153.15,3485 ; C26.1@3173.46,3913.94 3234.53,3975 ; U8.8@3174.26,3815.25 C26.1@3174.26,3909.21 ; 3185,1930 3175,1930 3090,2015 3090,2160 2975,2275 2894.28,2275 ; v1(3405,3980) 3655,3980 3908.46,3726.54 v1(4090,3726.54) ; 4090,3465 v1(4090,3615) ; C28.1 4483.94,2021.54 4560,1945.47 4560,1940 ; TP6.1 4565,3215 ; R28.2 4593.94,2019.13 4673.07,1940 4680,1940 ; P1.2 5075,1995 5150,1920 ; 5080,3240 5080.24,3239.76 C37.1 ; C37.1@5116.87,3014.23 5224.23,3014.23 C36.1 5391.39,3013.46 5549.85,2855 P5.9 ; V1.4 V1.2 ; C20.1@5325,3398.5 C20.1@5336.5,3410 ; C20.1@5335.51,3410 C20.1@5336.5,3410 ; C20.1 C20.1@5336.5,3410 ; 2809.28,2360 2894.28,2275
  Bottom Layer w20: v1(2560,2275) v1(2740,2275) ; v1(2905,3215) 2905,3206.88 2920,3191.88 C23.1
  Bottom Layer w25: v1(2810,2630) C24.1 ; v1(3395,3360) 3395,3278.38 3420,3253.38 v1(3420,3135)
  Bottom Layer w40: v1(3305,3980) v1(3405,3980) ; v1(4090,3615) v1(4090,3726.54)
7segOE: P6.3 U2.1 | length 1725.1
  Top Layer w20: U2.1 2714.76,2669.76 2690,2645 2690,2553.12 2743.12,2500 v1(2750,2500) ; v1(2875,2500) 2875,2450 3330,1995 3860,1995 3905,2040 P6.3
  Bottom Layer w20: v1(2750,2500) v1(2875,2500)
7Vdc: C1.1 C5.1 C6.1 C19.1 C34.1 L1.2 R1.2 R24.2 TP5.1 V1.3 V2.3 | length 3347.2
  Top Layer w40: R1.2 4480.98,4565.55 4584.02,4565.55 C1.1 4586.54,4565 4635,4565 4675,4525 L1.2 4915,4410 5004.29,4320.71 C5.1 5180.83,4321.54 C6.1 5470.98,4320.55 5574.02,4320.55 R24.2 ; V2.3 C34.1@4994.57,3420.82 ; C34.1 4997.09,3422.87 5062.87,3422.87 5163.15,3523.15 5163.15,4023.15 5325,4185 5510,4185 5575,4250 ; V1.3 5575.98,3999.25 C19.1 5575.24,4090.24 5575,4090.47 5575,4250 ; TP5.1 5709.78,4319.78 5575.22,4319.78 R24.2 ; 5575,4250 R24.2
DS1: P6.6 U2.11 | length 1543.4
  Top Layer w20: U2.11 3082.24,2887.76 3120,2850 3730,2850 3930,2650 3930,2415 4005,2340 P6.6
DS2: P6.4 U2.10 | length 1462.6
  Top Layer w20: U2.10 3068.74,2856.26 3105,2820 3715,2820 3900,2635 3900,2165 P6.4
DS3: P6.2 U2.9 | length 1435.6
  Top Layer w20: U2.9 3055.24,2824.76 3090,2790 3700,2790 3870,2620 3870,2410 3805,2345 P6.2
DS4: P6.1 U2.2 | length 1495.6
  Top Layer w20: U2.2 2748.13,2752.03 2748.13,2586.87 v1(2750,2585) ; v1(2875,2585) 2925,2535 2925,2445 3310,2060 P6.1
  Bottom Layer w20: v1(2750,2585) v1(2875,2585)
ESP_CLK_GPIO18: P5.7 U7.8 | length 2055.9
  Top Layer w15: U7.8 3975.67,3308.98 4574.64,2710 5246.78,2710 5251.78,2705 5505,2705 P5.7
ESP_MISO_GPIO19: P5.6 U7.7 | length 1945.3
  Top Layer w15: U7.7 3965.9,3283.39 4564.29,2685 5236.42,2685 5266.42,2655 P5.6
ESP_MOSI_GPIO23: P5.5 U7.6 | length 2076.1
  Top Layer w15: U7.6 3956.14,3257.8 4553.93,2660 5226.07,2660 5281.07,2605 5505,2605 P5.5
ESP_RST_GPION: P5.4 U7.5 | length 1965.5
  Top Layer w15: U7.5 3946.37,3232.2 4543.58,2635 5215,2635 5295,2555 P5.4
ESP_UART_RX: P5.2 TP12.1 U7.3 | length 2265.7
  Top Layer w15: U7.3 3926.84,3181.02 4522.87,2585 5194.29,2585 5324.29,2455 P5.2 TP12.1
ESP_UART_TX: P5.3 U7.4 | length 2096.3
  Top Layer w15: U7.4 3936.61,3206.61 4533.22,2610 5204.64,2610 5309.64,2505 5505,2505 P5.3
GND: C2.2 C3.2 C4.2 C5.2 C6.2 C7.2 C8.2 C10.2 C11.2 C13.2 C15.2 C16.2 C17.2 C18.2 C19.2 C20.2 C21.2 C22.2 C23.2 C24.2 C25.2 C26.2 C27.2 C28.2 C29.2 C30.2 C31.2 C32.2 C33.2 C34.2 C35.2 C36.2 C37.2 C38.2 CR2.2 D2.1 D4.2 D9.1 D11.1 P1.6 P3.2 P3.3 P4.1 P4.2 P4.3 P5.1 P5.10 P6.5 R5.1 R6.2 R7.1 R9.2 R26.1 R27.1 U1.3 U1.5 U1.6 U2.5 U2.21 U4.4 U5.4 U7.11 U8.4 V1.1 V2.1 | length 3274.3
  Top Layer w15: v1(3460,3360) 3460.08,3360.08 3539.92,3360.08 U7.11
  Top Layer w20: v1(2745,3030) 2780,3030 2809.25,3059.25 U2.21 ; v1(2830,2840) 2830,2831.88 2840.75,2821.13 U2.5
  Top Layer w25: C10.2 v1(1870,2970) ; C38.2 2049.04,2554.04 2049.04,2480.96 v1(2050,2480) ; C16.2 v1(2285,3600) ; v1(2235,2890) 2235,2839.2 U4.4@2268.94,2805.25 ; v1(2405,3720) 2405.77,3719.23 2405.77,3645.77 C29.2 ; C11.2 v1(2445,3155) ; v1(2525,3200) 2529.04,3204.04 2595.96,3204.04 C30.2 ; v1(2535,2725) 2535,2718.24 2557.82,2695.41 2557.82,2647.61 2559.45,2645.98 2559.45,2535.98 C18.2 ; P4.3 P4.3@2606.52,2038.48 ; U5.4@2621.13,3530.25 2660,3569.12 v1(2660,3570) ; C13.2 2792.14,3503.68 2831.91,3503.68 2858.24,3530 v1(2865,3530) ; v1(2920,3605) 2920,3635.85 2949.15,3665 U8.4 ; C27.2 v1(2970,2160) ; v1(3035,3910) C26.2 ; v1(3375,3020) C7.2 ; v1(3390,3600) C17.2 ; v1(3500,3600) R26.1 ; C15.2 v1(3720,3810) ; 4288.66,4106.34 4290,4105 ; C35.2 4405.38,3420 v1(4485,3420) ; C28.2 v1(4480,2165) ; R5.1 R5.1@4480.22,4800.22 ; 4559.78,4800.22 4560,4800 ; C31.2 v1(4590,2335) ; V2.1 4609.35,3420.17 4609.35,3340.65 v1(4610,3340) ; v1(4780,2075) P1.6 ; C34.2 4994.9,3641.15 v1(4994.9,3759.9) ; v1(5245,4000) C19.2 ; C20.2 v1(5685,3410) ; V1.1 5576.26,3614.72 5654.72,3614.72 v1(5655,3615)
  Top Layer w40: R7.1 1648.94,2764.57 1689.57,2723.94 R9.2 ; v1(1590,2395) D11.1 ; v1(1890,3121.93) D9.1 ; v1(4750,3015) C37.2 ; v1(5225,2875) C36.2
  Top Layer w50: v1(1365,2695) R6.2 ; v1(1470,2695) R7.1
  other v1: 4455,3915 4860,3915 4927.5,4050 2430,4185 2700,4185 2835,4185 3105,4185 3240,4185 3375,4185 3645,4185 3780,4185 3915,4185 4455,4185 4590,4185 4725,4185 4860,4185 4995,4185 4117.5,4320 4387.5,4320 5872.5,4320 2430,4455 2700,4455 2835,4455 3105,4455 3375,4455 3645,4455 4995,4455 5265,4455 5400,4455 5670,4455 5805,4455 2362.5,4590 2632.5,4590 2767.5,4590 3172.5,4590 3307.5,4590 3442.5,4590 3712.5,4590 3847.5,4590 4792.5,4590 4927.5,4590 5062.5,4590 5332.5,4590 5467.5,4590 5737.5,4590 5872.5,4590 2700,4725 2835,4725 3105,4725 3240,4725 3375,4725 3645,4725 3780,4725 3915,4725 4590,4725 4725,4725 4860,4725 4995,4725 5400,4725 5535,4725 5670,4725 5805,4725 2362.5,4860 2497.5,4860 2632.5,4860 2767.5,4860 2902.5,4860 3037.5,4860 3172.5,4860 3307.5,4860 3442.5,4860 3577.5,4860 3712.5,4860 3847.5,4860 3982.5,4860 4117.5,4860 4252.5,4860 4387.5,4860 4657.5,4860 4792.5,4860 4927.5,4860 5062.5,4860 5197.5,4860 5332.5,4860 5467.5,4860 5602.5,4860 5737.5,4860
MISO: P1.1 U2.16 U7.14 | length 2802.4
  Top Layer w15: U2.16 3079.88,3045.24 3318.03,3283.39 U7.14 3596.26,3283.39 3665,3214.64 3665,3069.64 3709.64,3025 3824.64,3025 4389.64,2460 4860,2460 v1(4935,2385) ; v1(5020,2385) 5075,2330 P1.1
  Bottom Layer w15: v1(4935,2385) v1(5020,2385)
MOSI: P1.4 U2.15 U7.15 | length 2764.9
  Top Layer w15: U2.15 3083.74,3013.74 3327.8,3257.8 U7.15 3586.49,3257.8 3640,3204.29 3640,3059.29 3699.29,3000 3810,3000 4375,2435 4820,2435 4925,2330 4925,2134.84 4975,2084.84 P1.4
NetC1_2: C1.2 R1.1 R5.2 U1.4 | length 776.1
  Top Layer w40: U1.4@4221.93,4189.32 4221.93,4306.93 4395,4480 4395,4590 4436.81,4631.81 4476.38,4631.81 R1.1 ; R5.2 R1.1 ; C1.2 4584.02,4634.45 4480.98,4634.45 R1.1
NetC9_1: C9.1 R11.2 R13.2 U4.7 | length 667.1
  Top Layer w25: C9.1 1868.31,2650.94 1976.35,2650.94 R11.2 1988.45,2661.07 2035.22,2661.07 2079.15,2705 U4.7 ; U4.7@2151.11,2705.25 2186.11,2740.25 2186.11,2991.11 2215,3020 R13.2
NetC9_2: C9.2 R9.1 R11.1 U4.6 | length 369.5
  Top Layer w25: R9.1 1761.01,2719.43 1866.92,2719.43 1867.33,2719.83 1976.35,2719.83 R11.1 2030.82,2720.82 2065,2755 U4.6
NetC10_1: C10.1 R10.1 R12.2 U4.5 | length 354
  Top Layer w25: R10.1 1763.7,2833.27 1864.8,2833.27 C10.1@1865,2833.46 ; C10.1 1870.98,2835.55 1967.91,2835.55 R12.2@1969.45,2834.02 ; R12.2@1980.22,2834.78 R12.2 2030.43,2834.57 2060,2805 U4.5
NetC13_1: C13.1 R16.2 U5.1 U5.2 | length 463.4
  Top Layer w25: U5.2 U5.1 2670,3380 2715,3425 C13.1@2715,3495 ; C13.1 2716.54,3556.54 2775.39,3615.39 2775.39,3658.86 R16.2@2780,3663.46
NetC14_1: C14.1 R19.2 R21.2 U5.7 | length 518.2
  Top Layer w25: C14.1 2150.98,3420.55 2259.02,3420.55 R19.2 ; U5.7 2394.72,3429.75 2324.75,3429.75 2314.57,3419.57 R19.2 ; R21.2 2330,3275 2260,3345 R19.2
NetC14_2: C14.2 R19.1 R20.1 U5.6 | length 355.3
  Top Layer w25: R20.1 2046.2,3489.23 2149.23,3489.23 C14.2 2150.98,3489.45 2259.02,3489.45 R19.1 2314.57,3490.43 2325,3480 U5.6
NetC16_1: C16.1 R22.1 R23.2 U5.5 | length 590.7
  Top Layer w25: R22.1 2145.43,3600 2145.98,3600.55 2145.98,3709.45 R23.2 2275,3710 2335,3650 2335,3555 2358.87,3531.13 2358.87,3530.25 2359.12,3530 U5.5
NetC17_1: C17.1 R25.2 R26.2 U8.5 | length 466.8
  Top Layer w25: U8.5 3265,3665 3340,3740 C17.1@3390,3740 ; C17.1 3390.98,3739.45 3499.02,3739.45 R26.2 R25.2
NetCR1_1: CR1.1 R2.2 R3.2 R18.2 | length 1.3
  Top Layer w50: R3.2@2153.62,4320 R3.2
NetCR2_1: CR2.1 L1.1 U1.2 | length 951
  Top Layer w40: U1.2 4087.87,4082.13 ; CR2.1@4193.89,3935 4120,3935 4087.87,3967.13 4087.87,4082.13 ; L1.1@4668,4025 4653,4040 4130,4040 4087.87,4082.13
NetD4_1: D4.1 R24.1 | length 107.2
  Top Layer w25: R24.1 D4.1
NetD5_1: D5.1 U4.1 | length 185.2
  Top Layer w25: D5.1 2218.39,2618.39 2255,2655 U4.1
NetD7_2: D7.2 D9.2 | length 98.1
  Top Layer w40: D9.2 D7.2
NetD10_2: D10.2 D11.2 | length 96.1
  Top Layer w40: D11.2 D10.2
NetR16_1: R16.1 R17.2 U8.3 | length 260.2
  Top Layer w25: R17.2 2850.43,3769.57 2850.43,3665.43 R16.1 2854.64,3665 2861.99,3672.34 2897.34,3672.34 2940,3715 U8.3
RST: C31.1 P1.5 R28.1 U2.29 U7.16 | length 3368
  Top Layer w15: U2.29 2704.25,2919.25 2775,2990 v1(2915,2990) ; v1(3150.05,3019.95) 3362.31,3232.2 U7.16 3540.52,3231.69 3575.44,3231.69 3615,3192.13 3615,3048.93 3688.93,2975 3799.64,2975 4364.64,2410 4785,2410 4875,2320 P1.5
  Top Layer w25: R28.1 C31.1 ; 4590,2141.1 4841.73,2141.1 4875,2174.37 P1.5
  Bottom Layer w15: v1(2915,2990) 3112.82,2990 3142.77,3019.95 v1(3150.05,3019.95)
RX: U2.30 U7.17 | length 1063.5
  Top Layer w15: U2.30 2717.76,2887.76 2745,2915 v1(2915,2915) ; v1(3220,2985) 3220,3045.36 3381.26,3206.61 U7.17
  Bottom Layer w15: v1(2915,2915) 3150,2915 v1(3220,2985)
SCK: P1.3 U2.17 U7.13 | length 2842.8
  Top Layer w15: U2.17 2935.61,3116.48 2935.61,3160.61 2970,3195 3194.29,3195 3308.27,3308.98 U7.13 3606.02,3308.98 3690,3225 3690,3080 3720,3050 3835,3050 4400,2485 4905,2485 4977.5,2412.5 4977.5,2177.5 P1.3
SH_CP: P6.8 U2.12 | length 1624.3
  Top Layer w20: U2.12 3095.75,2919.25 3135,2880 3745,2880 3960,2665 3960,2430 4105,2285 P6.8
SH_DS: P6.9 U2.14 | length 1902.5
  Top Layer w20: U2.14 3122.76,2982.24 3165,2940 3775,2940 4020,2695 4020,2460 4275,2205 4275,2140 4205,2070 P6.9
SH_ST: P6.10 U2.13 | length 1705.1
  Top Layer w20: U2.13 3109.25,2950.75 3150,2910 3760,2910 3990,2680 3990,2445 4205,2230 P6.10
TWISCL: P4.6 R15.1 U2.28 | length 1018.4
  Top Layer w20: U2.28 2590.75,2950.75 2570,2930 2570,2807.43 2660,2717.43 2660,2505.75 ; 2660.75,2505.75 2670,2496.5 ; P4.6 2700,2200 2670,2230 2670,2496.5 ; R15.1 2736.06,2430.43 2670,2496.5
TWISDA: P4.4 R14.1 U2.27 | length 1064.9
  Top Layer w20: R14.1 2563.94,2430.43 2630,2496.5 ; P4.4 2602.99,2147.99 2602.99,2202.01 2630,2229.03 2630,2496.5 ; U2.27 2579.82,2982.24 2540,2942.43 2540,2795 2630,2705 2630,2496.5
TX: U2.31 U7.18 | length 1139.4
  Top Layer w15: U2.31 2730,2856.26 2763.74,2890 2855,2890 2891.41,2853.59 2891.94,2853.59 2905.53,2840 v1(2915,2840) ; v1(3300,2985) 3300,3090 3391.02,3181.02 U7.18
  Bottom Layer w15: v1(2915,2840) 3165,2840 3286.41,2961.41 3286.41,2961.94 3300,2975.53 v1(3300,2985)
Vac: CR1.2 P2.2 P3.1 R4.2
VdcRaw: C2.1 C3.1 C4.1 C32.1 D2.2 R2.1 R3.1 R18.1 TP1.1 U1.1 | length 1910.5
  Top Layer w50: 2350,4320.94 2514.06,4320.94 C2.1 C32.1 2966.54,4321.54 C3.1 3543.46,4321.54 C4.1 3546.61,4318.39 D2.2 3921.61,4318.39 4020.08,4219.92 U1.1@4020.08,4190.39 ; TP1.1 3990,4046.22 4020.94,4077.17 U1.1
Vim: C11.1 R13.1 TP9.1 U2.25 U4.3 | length 825.9
  Top Layer w20: C11.1 2524.49,3021.54 2548.19,3045.24 U2.25
  Top Layer w25: TP9.1 2266.29,3128.71 2311.29,3128.71 2340.43,3099.57 R13.1 2341.2,3020.77 C11.1@2444.23,3020.77 ; U4.3 2340.9,2755 2445,2859.1 C11.1
Vipk: C18.1 D5.2 R27.2 TP11.1 U2.26 U4.2 | length 1110.3
  Top Layer w20: R27.2 2489.57,2934.42 2568.89,3013.74 U2.26
  Top Layer w25: U4.2 2305.3,2704.75 2347.97,2704.75 2391.61,2661.11 D5.2 C18.1 ; TP11.1 2487.62,2482.62 2487.62,2531.08 C18.1 ; R27.2 2490.55,2644.02 2490.55,2535.98 C18.1
Vis: D10.1 P2.1 R6.1 R7.2 R8.1 R10.2 R20.2 TP3.1 | length 635.4
  Top Layer w25: R10.2 1690.41,2830.85 1690.41,2880.41 1752.73,2942.73 1752.73,2962.73 TP3.1
  Top Layer w40: R8.1 1758.62,3433.62 1798.62,3433.62 1855,3490 R20.2
  Top Layer w50: R7.2 1471.18,2835.43 1474.69,2831.93 D10.1 1590.96,2830.96 1688.6,2830.96 R10.2
Vvm: C30.1 R21.1 TP10.1 U2.24 U5.3 | length 869.9
  Top Layer w20: C30.1 2655,3275 2714.76,3215.24 U2.24
  Top Layer w25: C30.1 R21.1 2495.43,3330.43 2510,3345 2510,3445 2545,3480 U5.3 2549.17,3480 2513.92,3515.25 2513.92,3568.92 TP10.1
VvmCZ: R17.1 TP8.1 U2.23 U8.1 | length 1191.1
  Top Layer w20: TP8.1 2730.43,3840.43 2849.57,3840.43 R17.1 2851.28,3839.59 2900.41,3839.59 2925,3815 U8.1 v1(3075,3815) ; U2.23 2746.26,3326.26 3075,3655 v1(3075,3715)
  Bottom Layer w20: v1(3075,3715) v1(3075,3815)
Vvs: D7.1 R4.1 R8.2 R22.2 TP4.1 | length 504.5
  Top Layer w40: R4.1 1848.86,3600 ; TP4.1 1887.36,3727.36 1887.36,3638.5 1848.86,3600 ; R22.2@1970.94,3593.7 1970.94,3600 1927.7,3600 1890,3562.3 D7.1 1848.86,3600
  Top Layer w50: R8.2 R4.1
X1: C21.1 U2.7 Y1.1 | length 498.7
  Top Layer w20: U2.7 2905.24,2752.4 2905.24,2689.76 2945,2650 2945,2575 v1(2980,2540) ; Y1.1@3153.86,2540 Y1.1
  Top Layer w25: v1(2980,2540) Y1.1@3153.86,2540 ; Y1.1@3152.78,2538.01 Y1.1
  Bottom Layer w20: v1(2980,2540) C21.1
X2: C22.1 U2.8 Y1.2 | length 1234
  Top Layer w20: U2.8 2935.24,2718.78 2974.02,2680 3695,2680 3745,2630 3745,2584.54 3700,2539.54 Y1.2
  Bottom Layer w20: C22.1 v1(3700,2540)
pads on no net: C2.0 C4.0 C5.0 C19.0 C20.0 C32.0 C34.0 C35.0 C37.0 U2.3 U2.6 U2.19 U2.32 U7.1 U7.9 U7.12 U7.20

## Polygon pours and split planes (outlines as drawn)
GND on Top Layer "NONET_L-01_P-001" (solid, pour order 14): 2310,4110 2375,4110 2405,4140 3720,4140 4045,3815 4840,3815 5260,4235 5980,4235 5980,4970 2259.05,4970 2259.05,4160.94
5Vdc on Top Layer "5VDC_L01_P008" (solid, pour order 8): 3138.16,3505 3120,3486.84 3120,3483.16 3138.16,3465 3380,3465 3410,3435 4000,3435 4250,3185 5040,3185 5082.5,3142.5 5125,3185 5320,3185 5625,2880 5625,2220 5365,1960 2415,1960 2415,1905 2595,1905 2655,1845 5500,1845 5770,2115 5770,2950 5425,3295 5425,3795 5400,3820 5265,3820 5240,3795 5240,3365 5160,3285 4315,3285 4070,3530 4045,3505
Vis on Top Layer "VIS_L01_P007" (solid, pour order 7): 1726.46,3208.48 1775,3257.02 1775,3450 1610,3450 1580,3420 1150,3420 1120,3390 1120,2900 1210,2810 1490,2810 1505,2825 1505,2875 1515,2885 1635,2885 1690,2940 1690,3173.54
NetCR1_1 on Top Layer "NONET_L-01_P-001" (solid, pour order 12): 1960,4265 1970,4255 2025,4255 2120,4160 2175,4160 2175,4480 2120,4480 2027.5,4387.5 1972.5,4387.5 1960,4375
VdcRaw on Top Layer "NONET_L-01_P-001" (solid, pour order 11): 2205,4480 2260,4480 2420,4320 2260,4160 2205,4160
Vac on Top Layer "VAC_L01_P006" (solid, pour order 6): 1765,3770 1780,3755 1780,3650 1710,3650 1640,3580 1580,3580 1160,3580 1120,3620 1120,4305 1350,4535 1820,4535 1940,4415 1940,4225 1829.76,4114.76 1765,4052.92
GND on Bottom Layer "GND_L02_P001" (solid, pour order 1): 1052.5,4963.25 5974.74,4973.76 5974.74,1735.26 1052.5,1735.26

## Keep-outs
Keep-Out Layer:
  lines w10: 1045,1760 1075,1730 5950,1730 5980,1760 5980,4937.01 5950,4967.01 1075,4967.01 1045,4937.01 1045,1760

## Other copper
Bottom Layer:
  pour cut-out: 1680,3010 1680,2910 1520,2750 1520,2490 1540,2490 1540,2740 1700,2900 1700,3005 1825,3130 1825,3810 1915,3900 2195,3900 2415,4120 3710,4120 4035,3795 4850,3795 5270,4215 6005,4215 6005,4235 5260,4235 4840,3815 4045,3815 3720,4140 2405,4140 2185,3920 1905,3920 1805,3820 1805,3135

## Silkscreen, mask and mechanical layers (free items; w line width, h text height)
Top Overlay:
  lines w8: 1784.89,2085.93 1785.72,2085.93 1809.05,2062.6 ; 1785.1,2086.14 1779.94,2086.14 1770.65,2095.43 1770.65,2104.92 1781.18,2115.45 1802.86,2115.45 1810.08,2108.23 1810.08,2027.71 ; 1787.79,2018.01 1775.4,2005.63 1775.4,1995.3 1786.13,1984.57 1801.82,1984.57 ; 1788.61,2018.42 1805.33,2018.42 ; 1798.29,2130.29 1798.04,2130.29 1782.21,2146.11 1782.21,2184.41 1800.17,2202.37 1800.17,2260.17 1835.27,2295.27 1851.99,2295.27 1867.06,2280.2 1867.06,2240.56 1860.04,2233.54 ; 1835.89,1982.92 1895.14,1982.92 ; 1863.14,2151.99 1867.27,2151.99 ; 1866.85,2239.53 1897.61,2239.53 ; 1894.52,2236.43 1897.61,2239.53 ; 1897.82,2017.39 1880.89,2000.46 1880.89,1998.81 1899.27,1980.44 1992.47,1980.44 2012.04,2000 2014.2,2000 2105.14,2000 2124.5,2019.35 2168.16,2019.35 2195.65,2019.35 2175,2040 2085,2040 2045,2080 2001.72,2080 1995,2080 ; 1994.23,2003.87 1994.23,2110.77 1974.62,2130.38 1974.62,2246.55 1985,2256.93 1985,2316.88 1978.13,2323.76 1955.62,2323.76 1897.61,2265.74 1897.61,2239.53
  lines w30: 1835.33,2151.59 cw(c1832.17,2161.08) 1836.03,2151.85 ; 1920.62,2173.08 cw(c1910.62,2173.26) 1920.62,2173.26
  text "EE209" at 1150,2140 h90
  text "TEAM07" at 1145,2005 h90
Mechanical 1:
  lines w10: 5980,4905 5980,4910 ; 1047.24,1760 1077.24,1730 5950,1730 5980,1760 5980,4938.5 5950,4968.5 1077.24,4968.5 1047.24,4938.5 1047.24,1760

## Text inside footprints (layer, text, board x,y; h text height)
P1: Top Overlay "6" at 4815,2095 h30 r180; Top Overlay "5" at 4815,2195 h30 r180; Top Overlay "1" at 5155,2195 h30 r180
P4: Top Overlay "6" at 2760,2125 h30; Top Overlay "5" at 2760,2025 h30; Top Overlay "1" at 2420,2025 h30
U1: Top Overlay "u" at 4372.8,4745.14 h30 r270
U7: Top Overlay "*" at 3792.5,3120.87 h30 r180; Mechanical 13 "*" at 3741,3168 h30 r180